# Allegro board PROC114E3_BRD.brd
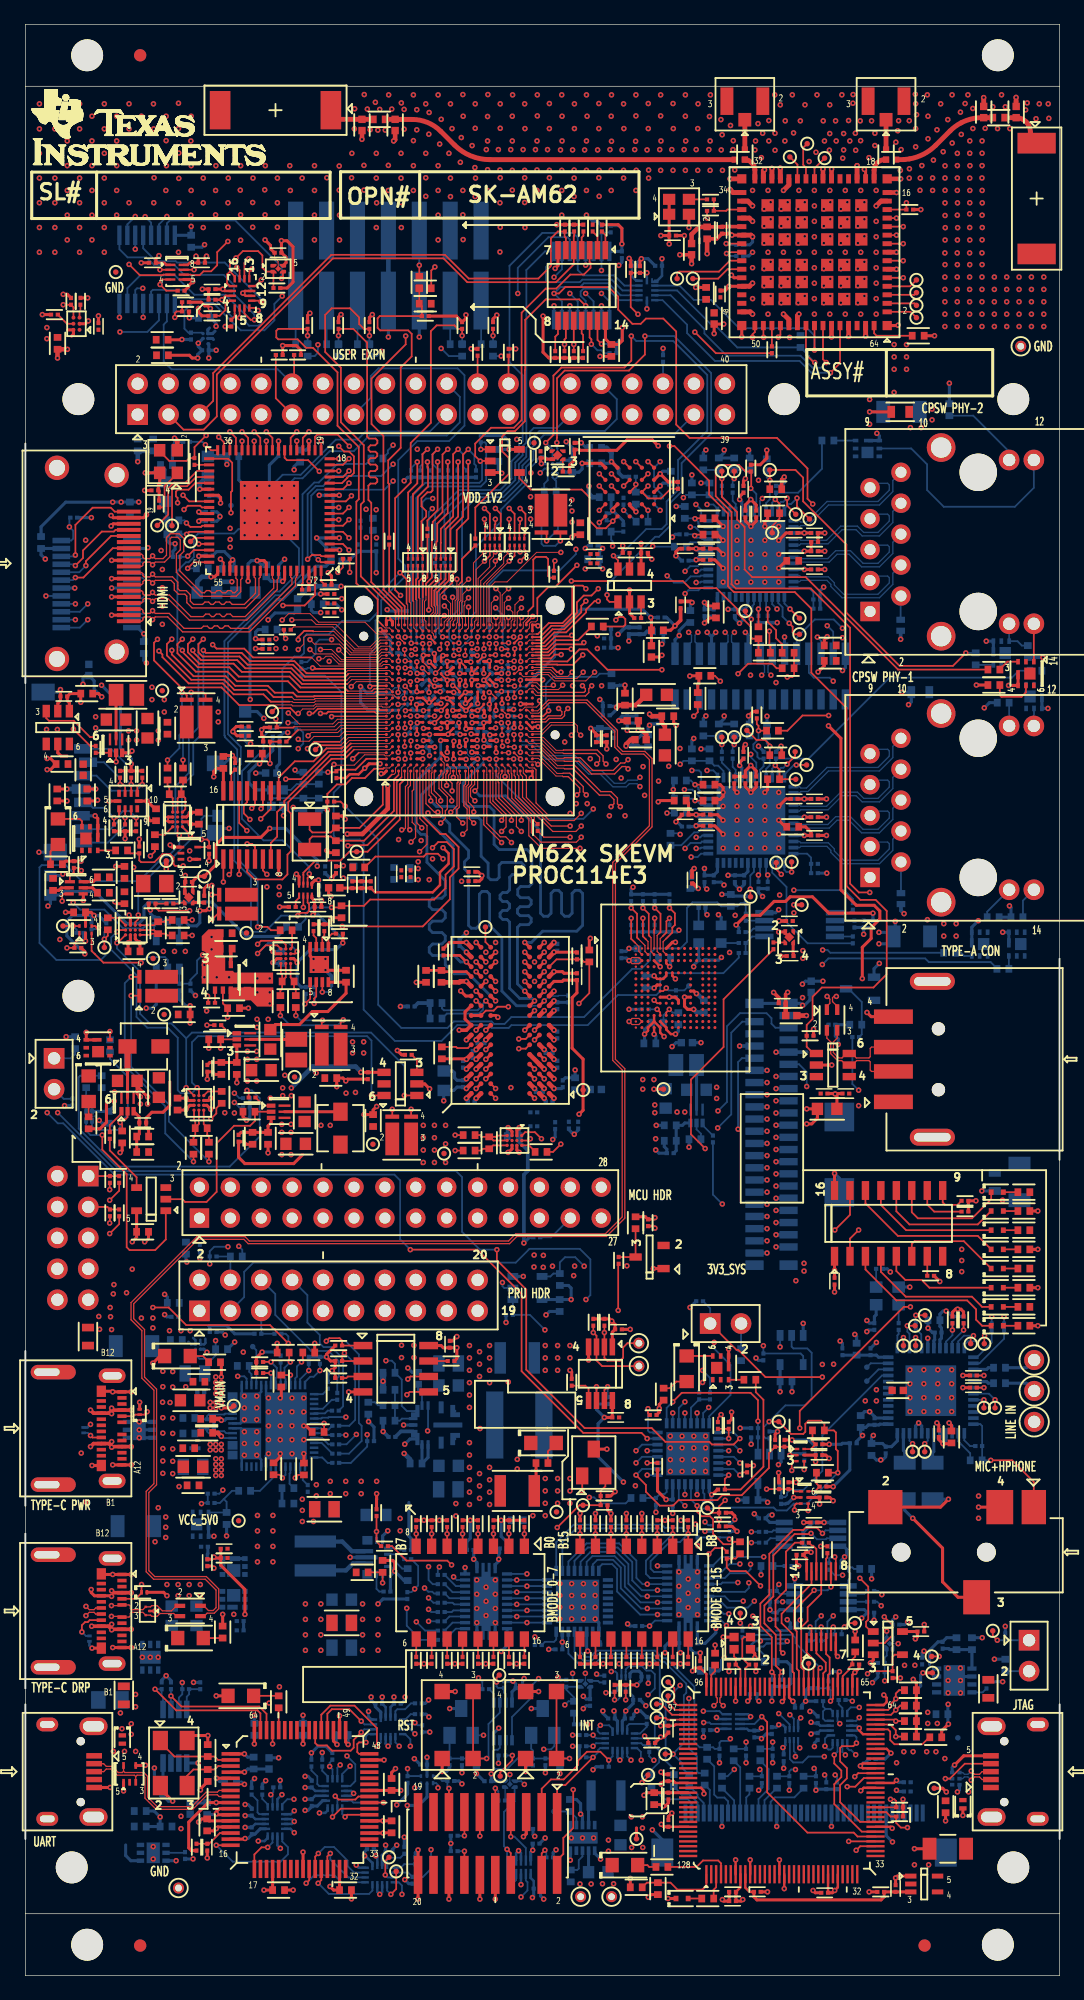
[diagram p0: board, top side]
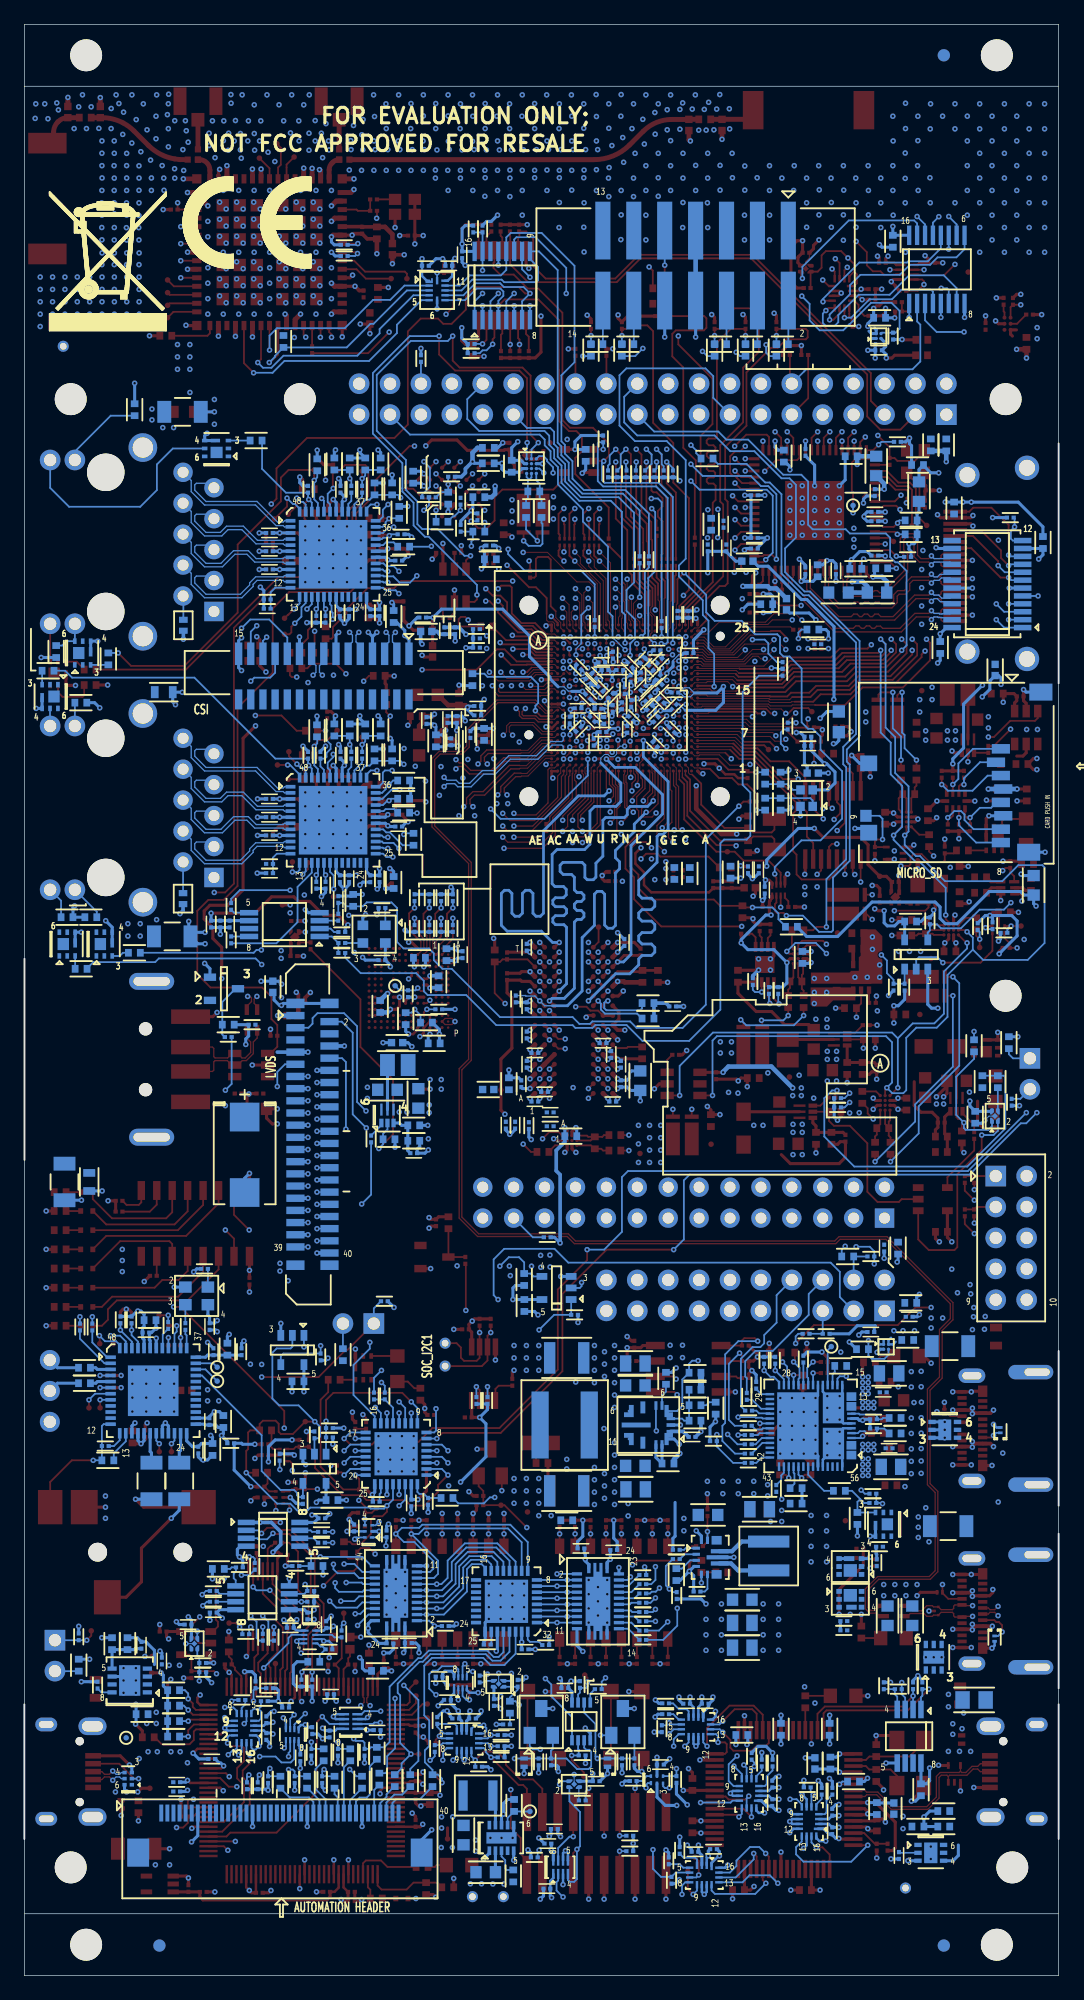
[diagram p1: board, bottom side, seen from below]

Outline 85 x 160.26 mm; copper layers: TOP, L02_GND1, L03_SIG1, L04_GND2, L05_PWR1, L06_PWR2, L07_GND3, L08_SIG2, L09_GND4, BOTTOM. Coordinates in mm from the lower left corner of the outline.
Outline path: 0,155.18 0,160.26 85,160.26 85,155.18 ; 0,155.18 0,5.08 ; 0,155.18 85,155.18 ; 0,5.08 0,0 85,0 85,5.08 ; 0,5.08 85,5.08 ; 85,5.08 85,155.18

## Design rules (mm)
net group CPSW_ETH1_D0: nets CPSW_ETH1_D0N CPSW_ETH1_D0P
net group CPSW_ETH1_D1: nets CPSW_ETH1_D1M CPSW_ETH1_D1P
net group CPSW_ETH1_D2: nets CPSW_ETH1_D2M CPSW_ETH1_D2P
net group CPSW_ETH1_D3: nets CPSW_ETH1_D3M CPSW_ETH1_D3P
net group CPSW_ETH2_D0: nets CPSW_ETH2_D0N CPSW_ETH2_D0P
net group CPSW_ETH2_D1: nets CPSW_ETH2_D1M CPSW_ETH2_D1P
net group CPSW_ETH2_D2: nets CPSW_ETH2_D2M CPSW_ETH2_D2P
net group CPSW_ETH2_D3: nets CPSW_ETH2_D3M CPSW_ETH2_D3P
net group CPSW_RGMII1_RXC: nets CPSW_RGMII1_RXC N17167245
net group CPSW_RGMII1_TXC: nets CPSW_RGMII1_TXC N16944070
net group CPSW_RGMII2_RXC: nets CPSW_RGMII2_RXC N17167691
net group CPSW_RGMII2_TXC: nets CPSW_RGMII2_TXC N16944341
net group FT4232_USB: nets FT4232_USB_DM FT4232_USB_DP
net group HDMI_PCLK: nets HDMI_PCLK SOC_VOUT0_PCLK
net group MCASP1_AFSX: nets MCASP1_AFSX N19066711
net group MCASP1_AXR0: nets MCASP1_AXR0 N19066744
net group MCASP1_AXR2: nets MCASP1_AXR2 N20055845
net group MCASP1_AXR2_AUD: nets MCASP1_AXR2_AUD N16929474
net group MMC0_CLK: nets MMC0_CLK SOC_MMC0_CLK
net group MMC1_CLK_R: nets MMC1_CLK MMC1_CLK_R
net group MMC2_CLK: nets MMC2_CLK SOC_MMC2_CLK
net group OSPI0_CSN0: nets OSPI0_CSN0 OSPI_CS
net group OSPI_CLK: nets N16960546 OSPI_CLK
net group SOC_OSPI_DQ0: nets OSPI_DQ0 SOC_OSPI_DQ0
net group SOC_OSPI_DQ1: nets OSPI_DQ1 SOC_OSPI_DQ1
net group SOC_OSPI_DQ2: nets OSPI_DQ2 SOC_OSPI_DQ2
net group SOC_OSPI_DQ3: nets OSPI_DQ3 SOC_OSPI_DQ3
net group SOC_OSPI_DQ4: nets OSPI_DQ4 SOC_OSPI_DQ4
net group SOC_OSPI_DQ5: nets OSPI_DQ5 SOC_OSPI_DQ5
net group SOC_OSPI_DQ6: nets OSPI_DQ6 SOC_OSPI_DQ6
net group SOC_OSPI_DQ7: nets OSPI_DQ7 SOC_OSPI_DQ7
net group SOC_USB0_DM: nets SOC_USB0_DM USBC_CONN2_DM
net group SOC_USB0_DP: nets SOC_USB0_DP USBC_CONN2_DP
net group SOC_USB1_DM: nets SOC_USB1_DM USB0_TYPEACONN1_DM
net group SOC_USB1_DP: nets SOC_USB1_DP USB0_TYPEACONN1_DP
net group XDS_USB: nets XDS_USB_DM XDS_USB_DP
net group DDR_ADDR: nets DDR_ALERTN
net group DDR_ADDR-1: nets DDR_TEN
net group HDMI_DIFF: nets HDMI_CLK+ HDMI_CLK- HDMI_TX0+ HDMI_TX0- HDMI_TX1+ HDMI_TX1- HDMI_TX2+ HDMI_TX2-
net group MCASP1: nets MCASP1_ACLKX
net group OSPI0_LBCLK: nets N16956470 OSPI0_LBCLK OSPI_DQS OSPI_DQS_SOC
net group PWR: nets VDDA_1V8_CSIRX VDDA_1V8_MCU VDDA_1V8_OLDI VDDA_1V8_USB VDDA_PLL0 VDDA_PLL1 VDDA_PLL2

## Placement (name value [footprint] x y rotation side)
A1  W3006  [ANT2_W3006_390X130_SMD]  20.56 153.21 180 top
A2  W3006  [ANT2_W3006_390X130_SMD]  83.11 145.95 270 top
ACC*  -  [unnamed#3]  35.67 104.69 90 top
C1  2.4pF  [CAP0402_0-75]  79.99 152.59 180 top
C2  1pF  [CAP0402_0-75]  29.08 152.45 0 top
C3  0.1uF  [CAP0201_0-5]  57.24 143.34 270 top
C4  2.2uF  [CAP0402_0-75]  56.03 143.13 270 top
C5  0.1uF  [CAP0201_0-5]  53.19 142.91 0 top
C6  0.1uF  [CAP0201_0-5]  10.44 140.67 0 top
C7  0.1uF  [CAP0201_0-5]  14.48 140.67 180 top
C8  0.1uF  [CAP0201_0-5]  15.34 138.51 0 top
C9  10uF  [CAP0402_0-75]  55.94 138.16 90 top
C10  0.1uF  [CAP0201_0-5]  57.12 138.12 90 top
C11  0.1uF  [CAP0201_0-5]  15.34 137.65 0 top
C12  1uF  [CAP0201_0-5]  6.01 135.46 90 top
C13  2.2uF  [CAP0402_0-75]  11.24 134.35 0 top
C14  2.2uF  [CAP0402_0-75]  2.64 134.06 270 top
C15  0.1uF  [CAP0402_0-75]  11.27 133.08 180 top
C16  1uF  [CAP0201_0-5]  45.13 125.61 90 top
C17  1uF  [CAP0201_0-5]  42.34 124.92 270 top
C18  0.1uF  [CAP0402_0-75]  43.13 121.9 0 bottom
C19  1uF  [CAP0201_0-5]  59.02 122.07 90 top
C20  0.1uF  [CAP0201_0-5]  10.64 121.98 0 top
C21  1uF  [CAP0201_0-5]  59.17 120.04 270 top
C22  0.1uF  [CAP0201_0-5]  60.06 120.04 270 top
C23  0.1uF  [CAP0402_0-75]  45.61 118.83 90 top
C24  0.01uF  [CAP0201_0-5]  63.18 118.49 180 top
C25  0.1uF  [CAP0201_0-5]  64.85 118.49 0 top
C26  0.01uF  [CAP0201_0-5]  64.86 117.74 0 top
C27  0.1uF  [CAP0201_0-5]  54.22 117.19 180 top
C28  1uF  [CAP0201_0-5]  55.99 117.19 0 top
C29  0.1uF  [CAP0201_0-5]  64.85 116.99 0 top
C30  0.01uF  [CAP0201_0-5]  50.88 116.85 180 top
C31  0.1uF  [CAP0201_0-5]  46.73 116.75 0 top
C32  0.1uF  [CAP0201_0-5]  55.99 116.28 0 top
C33  10uF  [CAP0402_0-75]  63.06 116.2 180 top
C34  0.1uF  [CAP0201_0-5]  46.73 115.99 0 top
C35  1uF  [CAP0201_0-5]  64.85 115.49 0 top
C36  0.1uF  [CAP0201_0-5]  25.11 113.47 180 top
C37  1uF  [CAP0201_0-5]  25.11 112.71 0 top
C38  0.01uF  [CAP0201_0-5]  53.85 112.58 270 top
C39  10uF  [CAP0402_0-75]  56.76 112 270 top
C40  0.1uF  [CAP0201_0-5]  25.11 111.95 180 top
C41  4.7uF  [CAP0402_0-75]  51.94 110.5 0 top
C42  0.1uF  [CAP0201_0-5]  19.77 109.73 180 top
C43  10uF  [CAP0402_0-75]  66.15 109.25 180 top
C44  0.1uF  [CAP0201_0-5]  19.77 108.97 180 top
C45  0.1uF  [CAP0402_0-75]  66.15 107.98 180 top
C46  0.1uF  [CAP0402_0-75]  5.04 105.29 0 top
C47  1uF  [CAP0201_0-5]  3.16 105.06 180 top
C48  4.7uF  [CAP0402_0-75]  49.28 104.84 90 top
C49  4.7uF  [CAP0402_0-75]  52.79 103.44 0 top
C50  4.7uF  [CAP0603_1]  7.46 103.16 0 top
C51  0.01uF  [CAP0201_0-5]  18.06 102.59 180 top
C52  22uF  [CAP0603_1]  10.04 102.45 270 top
C53  0.1uF  [CAP0402_0-75]  11.68 102.45 90 top
C54  0.1uF  [CAP0201_0-5]  18.06 101.83 180 top
C55  0.1uF  [CAP0201_0-5]  46.89 101.59 90 top
C56  0.1uF  [CAP0201_0-5]  47.78 101.59 90 top
C57  4.7uF  [CAP0402_0-75]  18.98 100.36 0 top
C58  1uF  [CAP0201_0-5]  59.02 100.23 90 top
C59  0.1uF  [CAP0402_0-75]  16.27 99.64 270 top
C60  4.7uF  [CAP0402_0-75]  3.02 99.51 180 top
C61  0.01uF  [CAP0201_0-5]  58.26 98.2 270 top
C62  1uF  [CAP0201_0-5]  59.17 98.2 270 top
C63  0.1uF  [CAP0201_0-5]  60.06 98.2 270 top
C64  0.1uF  [CAP0402_0-75]  12.32 97.03 0 top
C65  2.2uF  [CAP0402_0-75]  2.62 96.97 90 top
C66  0.1uF  [CAP0402_0-75]  5.08 96.97 90 top
C67  0.01uF  [CAP0201_0-5]  63.18 96.64 180 top
C68  0.1uF  [CAP0201_0-5]  64.85 96.64 0 top
C69  10uF  [CAP0402_0-75]  53.81 96.5 180 top
C70  0.1uF  [CAP0201_0-5]  54.22 95.35 180 top
C71  1uF  [CAP0201_0-5]  55.99 95.35 0 top
C72  0.1uF  [CAP0402_0-75]  10.74 95.35 90 top
C73  0.1uF  [CAP0201_0-5]  64.85 95.14 0 top
C74  0.1uF  [CAP0402_0-75]  14.26 95.06 90 top
C75  9pF  [CAP0402_0-75]  25.52 94.75 90 top
C76  0.1uF  [CAP0201_0-5]  55.99 94.44 0 top
C77  10uF  [CAP0402_0-75]  63.06 94.35 180 top
C78  1uF  [CAP0201_0-5]  64.85 93.64 0 top
C79  9pF  [CAP0402_0-75]  25.52 92.72 270 top
C80  0.1uF  [CAP0201_0-5]  25.53 90.82 270 top
C81  1uF  [CAP0201_0-5]  36.7 90.66 0 top
C82  0.1uF  [CAP0201_0-5]  30.89 90.5 270 top
C83  0.1uF  [CAP0201_0-5]  31.65 90.5 270 top
C84  0.01uF  [CAP0201_0-5]  54.79 89.98 270 top
C85  0.1uF  [CAP0201_0-5]  36.7 89.89 0 top
C86  1uF  [CAP0201_0-5]  13.42 89.82 0 top
C87  0.1uF  [CAP0402_0-75]  2.27 89.62 90 top
C88  1uF  [CAP0201_0-5]  26.86 89.6 90 top
C89  0.1uF  [CAP0201_0-5]  27.63 89.6 90 top
C90  0.01uF  [CAP0201_0-5]  28.39 89.6 90 top
C91  2.2uF  [CAP0402_0-75]  8.14 88.53 270 top
C92  1uF  [CAP0201_0-5]  14.7 88.41 90 top
C93  0.1uF  [CAP0201_0-5]  24.05 87.77 180 top
C94  0.1uF  [CAP0402_0-75]  4.45 87.33 180 top
C95  1uF  [CAP0201_0-5]  62.79 86.62 180 top
C96  0.1uF  [CAP0402_0-75]  10.91 86.07 270 top
C97  0.1uF  [CAP0402_0-75]  16.5 85.62 0 top
C98  2.2uF  [CAP0402_0-75]  16.5 84.35 180 top
C99  0.1uF  [CAP0402_0-75]  8.93 84.12 0 top
C100  1uF  [CAP0201_0-5]  62.85 83.74 180 top
C101  0.1uF  [CAP0402_0-75]  26.35 82.08 90 top
C102  0.1uF  [CAP0201_0-5]  45.33 82.04 270 top
C103  0.1uF  [CAP0402_0-75]  21.59 81.65 180 top
C104  2.2uF  [CAP0402_0-75]  18.25 81.42 90 top
C105  120pF  [CAP0201_0-5]  9.65 70.06 180 top
C106  0.1uF  [CAP0402_0-75]  13.05 78.94 180 top
C107  22uF  [CAP0603_1]  10.97 72.94 270 top
C108  4.7uF  [CAP0603_1]  20.13 76.9 270 top
C110  4.7uF  [CAP0603_1]  8.38 73.49 0 top
C111  120pF  [CAP0201_0-5]  14.95 74.51 90 top
C112  22uF  [CAP0603_1]  19.39 74.36 180 top
C113  0.01uF  [CAP0201_0-5]  28.15 73.91 90 top
C114  0.1uF  [CAP0402_0-75]  25.1 73.72 180 top
C115  0.1uF  [CAP0201_0-5]  65.64 72.44 0 top
C116  0.1uF  [CAP0402_0-75]  12.51 71.58 270 top
C117  4.7uF  [CAP0603_1]  22.95 70.95 270 top
C118  0.1uF  [CAP0402_0-75]  28.58 70.23 270 top
C119  0.1uF  [CAP0402_0-75]  14.45 69.6 180 top
C120  120pF  [CAP0201_0-5]  17.52 68.77 90 top
C121  0.1uF  [CAP0402_0-75]  38.12 68.4 90 top
C122  22uF  [CAP0603_1]  22.21 68.32 180 top
C129  0.1uF  [CAP0201_0-5]  62.2 79.87 0 top
C134  0.1uF  [CAP0201_0-5]  34.87 51.85 90 top
C135  220pF  [CAP0402_0-75]  23.29 51.18 0 top
C136  220pF  [CAP0402_0-75]  21.19 51.18 180 top
C137  0.1uF  [CAP0201_0-5]  77.91 49.29 180 top
C138  4.7uF  [CAP0402_0-75]  21.03 48.83 270 top
C139  0.1uF  [CAP0402_0-75]  14.26 48.77 180 top
C140  0.1uF  [CAP0201_0-5]  77.91 48.29 180 top
C141  10uF  [CAP0603_1]  13.54 47.25 180 top
C142  10uF  [CAP0402_0-75]  14.9 45.73 0 top
C143  4.7uF  [CAP0402_0-75]  24.06 44.65 180 top
C144  10uF  [CAP0402_0-75]  14.9 44.58 0 top
C145  0.1uF  [CAP0201_0-5]  75.07 44.5 90 top
C146  10uF  [CAP0402_0-75]  76.11 44.25 90 top
C147  0.1uF  [CAP0402_0-75]  13.43 43.32 180 top
C148  0.1uF  [CAP0201_0-5]  65.22 42.75 0 top
C149  10uF  [CAP0805_1-5]  24.57 38.31 180 bottom
C150  10uF  [CAP0603_1]  13.78 41.79 180 top
C151  220pF  [CAP0402_0-75]  20.4 41.63 90 top
C152  220pF  [CAP0402_0-75]  22.89 41.62 90 top
C153  0.1uF  [CAP0402_0-75]  13.78 40.27 180 top
C154  47uF  [CAP1210_2-75]  40.43 39.81 180 top
C155  10uF  [CAP0603_1]  26 30.88 180 bottom
C156  0.1uF  [CAP0201_0-5]  47.56 38.64 180 top
C157  0.1uF  [CAP0201_0-5]  65.55 39.27 0 top
C158  22uF  [CAP0805_1-5]  26 28.97 180 top
C159  0.1uF  [CAP0201_0-5]  48.74 53.08 0 top
C160  22uF  [CAP0805_1-5]  26 26.94 180 bottom
C161  0.1uF  [CAP0201_0-5]  16.33 35.06 180 top
C162  0.1uF  [CAP0201_0-5]  14.95 33.92 90 top
C164  0.1uF  [CAP0402_0-75]  31.42 32.94 270 bottom
C166  0.1uF  [CAP0201_0-5]  48.52 45.85 0 top
C167  0.1uF  [CAP0201_0-5]  73.59 28.26 0 top
C169  0.1uF  [CAP0201_0-5]  68.24 25.56 180 top
C170  0.1uF  [CAP0201_0-5]  55.46 25.56 270 top
C171  12pF  [CAP0201_0-5]  58.1 25.55 0 top
C172  12pF  [CAP0201_0-5]  59.75 25.55 180 top
C173  0.1uF  [CAP0201_0-5]  52.85 20.24 90 top
C174  18pF  [CAP0402_0-75]  14.99 18.49 90 top
C175  18pF  [CAP0402_0-75]  14.99 16.44 270 top
C176  0.01uF  [CAP0201_0-5]  52.85 16.26 90 top
C177  0.1uF  [CAP0402_0-75]  30.1 15.7 270 top
C178  1uF  [CAP0201_0-5]  52.85 14.75 270 top
C179  2.2uF  [CAP0402_0-75]  51.68 14.54 270 top
C180  4.7uF  [CAP0402_0-75]  75.62 13.87 270 top
C181  0.01uF  [CAP0201_0-5]  52.85 12.51 90 top
C182  0.1uF  [CAP0402_0-75]  14.94 12.38 90 top
C183  0.1uF  [CAP0402_0-75]  30.1 12.22 90 top
C184  0.1uF  [CAP0201_0-5]  14.95 10.55 90 top
C185  1000pF  [CAP1206_1-75]  75.81 10.42 0 top
C186  0.01uF  [CAP0201_0-5]  71.51 7.16 90 top
C187  0.1uF  [CAP0402_0-75]  20.81 7.03 180 top
C188  0.1uF  [CAP0402_0-75]  26.31 7.03 180 top
C189  0.01uF  [CAP0201_0-5]  58.12 6.88 180 top
C190  0.1uF  [CAP0201_0-5]  60.15 6.88 180 top
C191  0.01uF  [CAP0201_0-5]  65.69 6.81 180 top
C192  1uF  [CAP0201_0-5]  58.12 6.12 180 top
C193  2.2uF  [CAP0402_0-75]  14.72 136.15 180 bottom
C194  1uF  [CAP0201_0-5]  14.8 133.49 180 bottom
C195  1000pF  [CAP1206_1-75]  72 128.43 180 bottom
C196  0.1uF  [CAP0402_0-75]  10.5 125.71 90 bottom
C197  2.2uF  [CAP0402_0-75]  9.23 125.71 270 bottom
C198  4.7uF  [CAP0402_0-75]  46.86 125.48 0 bottom
C199  10uF  [CAP0402_0-75]  22.58 124.8 270 bottom
C200  0.1uF  [CAP0201_0-5]  20.8 125.1 270 bottom
C201  10uF  [CAP0402_0-75]  17.05 124.79 0 bottom
C202  0.1uF  [CAP0402_0-75]  38.87 124.86 270 bottom
C203  0.1uF  [CAP0402_0-75]  46.87 124.21 180 bottom
C204  10uF  [CAP0402_0-75]  11.6 124.06 0 bottom
C205  0.1uF  [CAP0402_0-75]  44.95 123.96 270 bottom
C206  0.1uF  [CAP0402_0-75]  53.05 123.06 270 bottom
C207  0.1uF  [CAP0201_0-5]  15.1 121.8 270 bottom
C208  0.1uF  [CAP0201_0-5]  59.02 122.07 90 bottom
C209  0.1uF  [CAP0201_0-5]  25 121.58 180 bottom
C210  0.1uF  [CAP0402_0-75]  47.65 121.42 180 bottom
C211  10uF  [CAP0402_0-75]  8.59 120.53 90 bottom
C212  0.1uF  [CAP0201_0-5]  15.1 120.21 0 bottom
C213  0.1uF  [CAP0201_0-5]  15.1 119.45 0 bottom
C214  4.7uF  [CAP0402_0-75]  28.56 119.2 270 bottom
C215  1uF  [CAP0201_0-5]  27.54 119.2 90 bottom
C216  0.1uF  [CAP0201_0-5]  64.85 118.49 0 bottom
C217  0.1uF  [CAP0201_0-5]  25 118.08 180 bottom
C218  0.1uF  [CAP0201_0-5]  46.75 117.45 0 bottom
C219  10uF  [CAP0402_0-75]  1.29 117.7 90 bottom
C220  0.01uF  [CAP0201_0-5]  28.84 117.26 90 bottom
C221  0.1uF  [CAP0201_0-5]  37.66 105.67 45 bottom
C222  1uF  [CAP0201_0-5]  27.31 117.26 90 bottom
C223  0.1uF  [CAP0201_0-5]  25 117.21 180 bottom
C224  1uF  [CAP0201_0-5]  64.85 116.99 0 bottom
C225  0.1uF  [CAP0201_0-5]  15.1 116.63 0 bottom
C226  4.7uF  [CAP0402_0-75]  46.7 116.33 0 bottom
C227  1uF  [CAP0201_0-5]  54.24 116.22 180 bottom
C228  1uF  [CAP0201_0-5]  64.85 115.49 0 bottom
C229  0.1uF  [CAP0201_0-5]  20.82 115.38 90 bottom
C230  10uF  [CAP0402_0-75]  19.8 115.38 90 bottom
C231  0.1uF  [CAP0201_0-5]  18.3 115.38 90 bottom
C232  22uF  [CAP0603_1]  14.92 113.59 180 bottom
C233  4.7uF  [CAP0402_0-75]  23.99 112.63 180 bottom
C234  22pF  [CAP0201_0-5]  65.04 112.26 180 bottom
C235  0.1uF  [CAP0201_0-5]  59.07 111.93 270 bottom
C236  1uF  [CAP0201_0-5]  58.31 111.93 270 bottom
C237  1uF  [CAP0201_0-5]  56.57 111.93 270 bottom
C238  0.1uF  [CAP0201_0-5]  55.81 111.93 270 bottom
C239  1uF  [CAP0201_0-5]  33.01 108.85 180 bottom
C240  0.1uF  [CAP0201_0-5]  30.44 111.8 270 bottom
C241  0.1uF  [CAP0201_0-5]  31.33 111.8 270 bottom
C242  10uF  [CAP0402_0-75]  54.65 111.62 270 bottom
C243  0.1uF  [CAP0201_0-5]  52.26 111.54 0 bottom
C244  1uF  [CAP0201_0-5]  47.84 110.59 0 bottom
C245  0.1uF  [CAP0201_0-5]  50.48 110.46 90 bottom
C246  1uF  [CAP0201_0-5]  49.59 110.46 90 bottom
C247  0.1uF  [CAP0201_0-5]  47.84 109.82 0 bottom
C248  10uF  [CAP0402_0-75]  9.73 109.08 90 bottom
C249  1uF  [CAP0201_0-5]  19.79 109.35 0 bottom
C250  0.1uF  [CAP0201_0-5]  47.84 109.06 0 bottom
C251  1uF  [CAP0201_0-5]  36.63 108.46 90 bottom
C252  0.1uF  [CAP0201_0-5]  34.16 107.99 135 bottom
C253  0.1uF  [CAP0201_0-5]  32.78 107.97 135 bottom
C254  0.1uF  [CAP0201_0-5]  37.54 107.85 0 bottom
C255  0.1uF  [CAP0201_0-5]  35.22 107.64 225 bottom
C256  1uF  [CAP0201_0-5]  39.43 107.46 45 bottom
C257  1uF  [CAP0201_0-5]  33.49 107.42 45 bottom
C258  1uF  [CAP0201_0-5]  32.93 106.61 315 bottom
C259  0.1uF  [CAP0201_0-5]  37.28 107.23 180 bottom
C260  0.1uF  [CAP0201_0-5]  36.06 107.23 0 bottom
C261  0.1uF  [CAP0201_0-5]  34.33 106.75 90 bottom
C262  0.1uF  [CAP0201_0-5]  38.18 106.73 45 bottom
C263  0.1uF  [CAP0201_0-5]  30.29 108.62 180 bottom
C264  0.1uF  [CAP0201_0-5]  35.18 106.53 90 bottom
C265  0.1uF  [CAP0201_0-5]  38.65 106.32 225 bottom
C266  0.1uF  [CAP0201_0-5]  31.54 105.38 180 bottom
C267  0.1uF  [CAP0201_0-5]  34.14 105.78 135 bottom
C268  0.1uF  [CAP0201_0-5]  36.81 105.12 315 bottom
C269  1uF  [CAP0201_0-5]  32.78 105.83 135 bottom
C270  0.01uF  [CAP0201_0-5]  38.68 105.03 225 bottom
C271  0.1uF  [CAP0201_0-5]  33.75 104.87 135 bottom
C272  0.1uF  [CAP0201_0-5]  32.63 104.72 45 bottom
C273  0.1uF  [CAP0201_0-5]  35.13 104.48 90 bottom
C274  0.1uF  [CAP0201_0-5]  35.88 104.29 90 bottom
C275  0.1uF  [CAP0201_0-5]  47.74 104.27 180 bottom
C276  1uF  [CAP0201_0-5]  31.61 104.21 135 bottom
C277  0.1uF  [CAP0201_0-5]  33.62 104.16 135 bottom
C278  0.1uF  [CAP0201_0-5]  39.5 104.08 0 bottom
C279  0.1uF  [CAP0201_0-5]  36.64 104.06 90 bottom
C280  0.1uF  [CAP0201_0-5]  37.86 104.05 0 bottom
C281  0.01uF  [CAP0201_0-5]  47.74 103.51 180 bottom
C282  0.1uF  [CAP0201_0-5]  35.13 103.23 45 bottom
C283  0.1uF  [CAP0201_0-5]  38.33 103.19 225 bottom
C284  0.1uF  [CAP0201_0-5]  50.22 103.16 270 bottom
C285  1uF  [CAP0201_0-5]  49.46 103.16 270 bottom
C286  0.1uF  [CAP0201_0-5]  33.08 103.16 135 bottom
C287  0.01uF  [CAP0201_0-5]  40.18 103.12 270 bottom
C288  0.01uF  [CAP0201_0-5]  37.34 103.09 270 bottom
C289  0.01uF  [CAP0201_0-5]  51.96 103.08 270 bottom
C290  0.01uF  [CAP0201_0-5]  39.46 102.37 315 bottom
C291  0.1uF  [CAP0201_0-5]  35.45 102.36 270 bottom
C292  0.1uF  [CAP0201_0-5]  37.45 102.14 0 bottom
C293  4.7uF  [CAP0402_0-75]  47.22 101.94 90 bottom
C294  1uF  [CAP0201_0-5]  31.76 102.3 225 bottom
C295  0.1uF  [CAP0201_0-5]  48.34 101.93 90 bottom
C296  0.01uF  [CAP0201_0-5]  20.61 101.76 180 bottom
C297  4.7uF  [CAP0402_0-75]  51.17 101.41 90 bottom
C298  0.1uF  [CAP0201_0-5]  49.91 101.33 90 bottom
C299  1uF  [CAP0201_0-5]  20.61 100.99 180 bottom
C300  0.1uF  [CAP0201_0-5]  35.67 105.55 90 bottom
C301  0.1uF  [CAP0201_0-5]  59.02 100.23 90 bottom
C302  1uF  [CAP0201_0-5]  38.21 101.31 90 bottom
C303  18pF  [CAP0402_0-75]  22.85 98.35 270 bottom
C304  0.1uF  [CAP0201_0-5]  64.85 96.64 0 bottom
C305  18pF  [CAP0402_0-75]  22.85 96.21 90 bottom
C306  1uF  [CAP0201_0-5]  64.85 95.14 0 bottom
C307  1uF  [CAP0201_0-5]  54.24 94.37 180 bottom
C308  1uF  [CAP0201_0-5]  64.85 93.64 0 bottom
C309  0.1uF  [CAP0201_0-5]  25.53 90.82 270 bottom
C310  0.1uF  [CAP0201_0-5]  24.64 90.82 270 bottom
C311  10uF  [CAP0402_0-75]  26.96 90.63 270 bottom
C312  22pF  [CAP0201_0-5]  64.85 90.55 180 bottom
C313  10uF  [CAP0402_0-75]  31.58 90.52 270 bottom
C314  4.7uF  [CAP0402_0-75]  30.31 90.52 270 bottom
C315  0.1uF  [CAP0201_0-5]  59.07 90.09 270 bottom
C316  1uF  [CAP0201_0-5]  58.31 90.09 270 bottom
C317  1uF  [CAP0201_0-5]  56.57 90.09 270 bottom
C318  0.1uF  [CAP0201_0-5]  55.81 90.09 270 bottom
C319  10uF  [CAP0402_0-75]  54.65 89.78 270 bottom
C320  10uF  [CAP0603_1]  2.06 89.55 90 bottom
C321  0.1uF  [CAP0201_0-5]  24.15 89.15 270 bottom
C322  10pF  [CAP0201_0-5]  59.2 88.38 90 bottom
C323  0.1uF  [CAP0402_0-75]  12.17 86.57 180 bottom
C324  1uF  [CAP0201_0-5]  69.65 86.37 90 bottom
C325  0.1uF  [CAP0201_0-5]  68.89 86.37 90 bottom
C326  0.1uF  [CAP0201_0-5]  68.13 86.37 90 bottom
C327  1000pF  [CAP1206_1-75]  72.85 85.35 180 bottom
C328  0.1uF  [CAP0201_0-5]  35.68 84.86 270 bottom
C329  0.01uF  [CAP0201_0-5]  43.72 84.46 90 bottom
C330  1uF  [CAP0201_0-5]  48.98 83.85 90 bottom
C331  0.1uF  [CAP0402_0-75]  50.31 83.85 90 bottom
C332  0.1uF  [CAP0402_0-75]  21.05 83.63 270 bottom
C333  0.1uF  [CAP0402_0-75]  52.53 83.59 180 bottom
C334  0.01uF  [CAP0201_0-5]  55.61 83.4 180 bottom
C335  0.1uF  [CAP0402_0-75]  50.95 81.63 270 bottom
C336  0.01uF  [CAP0201_0-5]  43.72 79.66 90 bottom
C337  0.01uF  [CAP0201_0-5]  31.72 79.6 180 bottom
C338  2.2uF  [CAP0402_0-75]  55.76 79.6 90 bottom
C339  0.01uF  [CAP0201_0-5]  43.72 77.26 90 bottom
C340  0.01uF  [CAP0201_0-5]  37.44 76.58 180 bottom
C341  2.2uF  [CAP0402_0-75]  51.32 76.57 0 bottom
C343  0.01uF  [CAP0201_0-5]  43.04 75.78 0 bottom
C344  0.01uF  [CAP0201_0-5]  36.77 75.66 270 bottom
C346  0.01uF  [CAP0201_0-5]  43.72 74.86 90 bottom
C347  0.01uF  [CAP0201_0-5]  35.97 74.86 90 bottom
C349  22uF  [CAP0603_1]  34.38 73.5 90 bottom
C350  0.01uF  [CAP0201_0-5]  35.97 73.26 90 bottom
C351  2.2uF  [CAP0402_0-75]  45.18 73.25 90 bottom
C352  0.1uF  [CAP0201_0-5]  44.16 73.25 270 bottom
C353  4.7uF  [CAP0603_1]  55.16 72.76 180 bottom
C354  0.01uF  [CAP0201_0-5]  42.24 72.58 0 bottom
C355  0.1uF  [CAP0201_0-5]  67.43 72.44 180 top
C356  10uF  [CAP0603_1]  65.89 71.19 0 top
C357  22uF  [CAP0603_1]  52.62 72.04 270 bottom
C358  0.01uF  [CAP0201_0-5]  43.04 71.78 180 bottom
C359  0.01uF  [CAP0201_0-5]  36.64 71.78 0 bottom
C361  0.1uF  [CAP0201_0-5]  41.78 70.9 180 bottom
C362  0.1uF  [CAP0201_0-5]  45.43 69.85 90 bottom
C363  0.1uF  [CAP0201_0-5]  44.67 69.85 90 bottom
C365  0.1uF  [CAP0402_0-75]  40.09 68.95 180 bottom
C367  120pF  [CAP0201_0-5]  53 67.55 0 bottom
C371  150uF_10V  [CAPT7343D_3-25]  66.89 67.42 270 bottom
C372  1000pF  [CAP1206_1-75]  81.7 65.19 270 bottom
C375  0.1uF  [CAP0201_0-5]  66.5 57.04 270 top
C376  1uF  [CAP0201_0-5]  14.34 59.75 270 bottom
C377  0.1uF  [CAP0402_0-75]  13.2 59.75 90 bottom
C379  2.2uF  [CAP0402_0-75]  12.15 55.26 180 bottom
C380  0.1uF  [CAP0402_0-75]  43.91 55.04 270 bottom
C381  0.1uF  [CAP0201_0-5]  12.28 54.11 0 bottom
C384  10uF  [CAP0402_0-75]  74.67 53.83 180 bottom
C385  0.1uF  [CAP0201_0-5]  50.12 140.43 180 bottom
C386  0.1uF  [CAP0201_0-5]  69.77 53.31 270 bottom
C387  1uF  [CAP0201_0-5]  15.43 52.86 0 bottom
C388  0.1uF  [CAP0201_0-5]  75.01 52.82 180 bottom
C391  2.2uF  [CAP0402_0-75]  12.4 52.21 180 bottom
C392  1000pF  [CAP1206_1-75]  8.93 51.7 0 bottom
C393  10uF  [CAP0402_0-75]  68.31 51.45 90 bottom
C394  0.1uF  [CAP0201_0-5]  69.46 51.24 90 bottom
C395  47uF  [CAP1210_2-75]  40.43 50.73 180 bottom
C396  1uF  [CAP0805_1-5]  34.79 50.28 0 bottom
C397  0.1uF  [CAP0402_0-75]  80.06 49.93 180 bottom
C398  1uF  [CAP0805_1-5]  13.93 49.46 180 bottom
C399  0.1uF  [CAP0402_0-75]  80.06 48.66 180 bottom
C400  10uF  [CAP0603_1]  34.79 48.47 0 bottom
C401  0.01uF  [CAP0201_0-5]  14.42 47.91 180 bottom
C402  36pF  [CAP0402_0-75]  29.88 46.85 0 bottom
C404  0.1uF  [CAP0201_0-5]  49.02 141.33 90 bottom
C405  0.1uF  [CAP0201_0-5]  69.79 45.51 90 bottom
C406  10uF  [CAP0402_0-75]  68.64 45.51 90 bottom
C407  1uF  [CAP0201_0-5]  30.13 44.24 180 bottom
C408  0.1uF  [CAP0402_0-75]  13.63 142.44 90 bottom
C409  0.01uF  [CAP0201_0-5]  13.93 43.31 180 bottom
C410  10uF  [CAP0402_0-75]  69.53 43.22 270 bottom
C411  0.1uF  [CAP0201_0-5]  70.7 43.16 270 bottom
C412  0.47uF  [CAP0402_0-75]  78.14 42.32 180 bottom
C413  0.1uF  [CAP0402_0-75]  32.1 42.06 180 bottom
C414  10uF  [CAP0603_1]  34.79 41.87 0 bottom
C415  1uF  [CAP0805_1-5]  13.78 41.79 180 bottom
C416  47uF  [CAP1206_2]  74.55 40.63 270 bottom
C417  47uF  [CAP1206_2]  72.27 40.63 270 bottom
C418  1uF  [CAP0805_1-5]  34.76 39.94 0 bottom
C419  47uF  [CAP1210_2-75]  40.43 39.81 180 bottom
C420  22uF  [CAP0805_1-5]  26 28.97 180 bottom
C421  0.1uF  [CAP0402_0-75]  59.72 39.06 180 bottom
C422  0.01uF  [CAP0201_0-5]  53.2 38.82 90 bottom
C423  4.7uF  [CAP0402_0-75]  21.58 38.77 0 bottom
C424  10uF  [CAP0603_1]  28.82 37.84 0 bottom
C425  10uF  [CAP0805_1-5]  24.57 38.31 180 top
C426  0.1uF  [CAP0402_0-75]  40.43 37.4 180 bottom
C427  1000pF  [CAP1206_1-75]  9.08 36.92 0 bottom
C429  0.1uF  [CAP0201_0-5]  57.89 36.77 270 bottom
C430  0.1uF  [CAP0201_0-5]  39.26 35.09 180 bottom
C431  0.1uF  [CAP0201_0-5]  36.56 34.96 180 bottom
C432  10uF  [CAP0603_1]  14.06 29.56 90 bottom
C433  10uF  [CAP0603_1]  12.03 29.56 90 bottom
C435  0.1uF  [CAP0201_0-5]  17.65 29.12 0 bottom
C437  0.1uF  [CAP0201_0-5]  71.55 28.83 180 bottom
C439  0.1uF  [CAP0201_0-5]  53.44 27.32 0 bottom
C440  0.1uF  [CAP0201_0-5]  54.95 27.29 180 bottom
C441  15pF  [CAP0201_0-5]  75.38 27.14 270 bottom
C442  0.01uF  [CAP0201_0-5]  43.85 26.8 0 bottom
C443  1uF  [CAP0201_0-5]  73.7 25.84 90 bottom
C445  0.1uF  [CAP0201_0-5]  50.91 24.56 180 bottom
C446  0.1uF  [CAP0201_0-5]  40.58 23.61 180 bottom
C449  0.1uF  [CAP0201_0-5]  59.83 23.12 180 bottom
C450  0.1uF  [CAP0201_0-5]  50.23 22.65 180 bottom
C451  0.01uF  [CAP0201_0-5]  46.41 22.44 90 bottom
C452  0.1uF  [CAP0201_0-5]  30.57 22.34 180 bottom
C453  0.1uF  [CAP0201_0-5]  29.05 22.34 0 bottom
C454  1uF  [CAP0201_0-5]  63.53 22.01 0 bottom
C455  2.2uF  [CAP0402_0-75]  75.32 21.47 0 bottom
C456  0.1uF  [CAP0201_0-5]  49.54 21.12 180 bottom
C457  0.1uF  [CAP0201_0-5]  48.17 21.12 0 bottom
C458  0.1uF  [CAP0201_0-5]  65.11 21.02 270 bottom
C459  8.2pF  [CAP0201_0-5]  45.37 20.64 0 bottom
C460  0.1uF  [CAP0402_0-75]  22.82 20.23 270 bottom
C461  0.1uF  [CAP0402_0-75]  18.82 20.23 270 bottom
C462  0.1uF  [CAP0201_0-5]  56.01 20.17 0 bottom
C463  0.1uF  [CAP0201_0-5]  61.34 20.13 90 bottom
C464  0.1uF  [CAP0201_0-5]  59.91 19.85 90 bottom
C465  4.7uF  [CAP0402_0-75]  26.04 19.76 180 bottom
C466  0.1uF  [CAP0201_0-5]  65.11 19.64 90 bottom
C467  0.1uF  [CAP0201_0-5]  62.32 17.89 90 bottom
C468  0.1uF  [CAP0201_0-5]  69.6 17.79 180 bottom
C469  0.1uF  [CAP0201_0-5]  41.72 17.55 90 bottom
C470  0.1uF  [CAP0201_0-5]  34.86 17.55 90 bottom
C471  0.1uF  [CAP0402_0-75]  18.76 17.46 270 bottom
C472  0.1uF  [CAP0201_0-5]  32.73 17.33 0 bottom
C473  0.01uF  [CAP0201_0-5]  38.01 15.97 0 bottom
C474  0.1uF  [CAP0201_0-5]  72.48 15.89 180 bottom
C475  0.1uF  [CAP0201_0-5]  23.53 15.73 270 bottom
C476  0.1uF  [CAP0402_0-75]  11.31 15.27 90 bottom
C477  0.1uF  [CAP0201_0-5]  72.48 15.12 180 bottom
C478  0.1uF  [CAP0201_0-5]  23.53 14.21 90 bottom
C479  0.1uF  [CAP0402_0-75]  14.94 13.72 90 bottom
C480  0.1uF  [CAP0402_0-75]  9.44 13.52 180 bottom
C481  0.1uF  [CAP0201_0-5]  18.61 13.42 270 bottom
C482  2.2uF  [CAP0402_0-75]  11.56 12.25 180 bottom
C483  10uF  [CAP0402_0-75]  9.44 12.25 180 bottom
C484  0.1uF  [CAP0201_0-5]  41.44 12.05 0 bottom
C485  0.1uF  [CAP0201_0-5]  18.61 11.9 90 bottom
C486  22uF  [CAP0603_1]  48.91 11.54 270 bottom
C487  0.1uF  [CAP0201_0-5]  41.97 10.84 180 bottom
C488  0.1uF  [CAP0201_0-5]  28.36 10.39 0 bottom
C489  0.1uF  [CAP0201_0-5]  29.88 10.17 180 bottom
C490  0.01uF  [CAP0201_0-5]  13.12 9.87 90 bottom
C491  4.7uF  [CAP0603_1]  47.08 8.49 0 bottom
C492  0.1uF  [CAP0201_0-5]  42.05 7.15 180 bottom
C493  0.1uF  [CAP0201_0-5]  33.15 101.12 225 bottom
C496  0.1uF  [CAP0201_0-5]  52.04 140.43 0 bottom
C497  0.1uF  [CAP0201_0-5]  20.76 141.5 0 top
C498  0.1uF  [CAP0402_0-75]  48.16 133.48 90 top
C499  0.1uF  [CAP0402_0-75]  9.63 61.09 0 top
C500  0.1uF  [CAP0402_0-75]  6.86 70.5 270 bottom
C502  0.1uF  [CAP0402_0-75]  6.27 73.42 90 bottom
C509  0.1uF  [CAP0402_0-75]  62.51 48.81 180 bottom
C510  0.1uF  [CAP0201_0-5]  64.8 37.22 180 top
C511  0.1uF  [CAP0201_0-5]  60.55 37.56 180 bottom
C512  0.1uF  [CAP0201_0-5]  61.75 29.54 270 bottom
C513  0.1uF  [CAP0201_0-5]  69.47 29.82 0 bottom
C514  0.1uF  [CAP0201_0-5]  63.65 34.56 180 top
C515  0.1uF  [CAP0201_0-5]  63.14 28.57 0 bottom
C516  0.1uF  [CAP0201_0-5]  60.2 28.83 90 bottom
D1  BZX84C6V8LT1G  [SOT23-123_1-2]  51.3 59.02 180 top
D2  TPD1E01B04DPLT  [DIO_DFN0201_0-4]  9.39 46.3 90 top
D4  TPD1E01B04DPLT  [DIO_DFN0201_0-4]  9.77 31.48 0 top
D5  ESD122DMXR  [X2SON3_ESD122DMX_30X40_0-4]  10.04 29.95 180 top
D7  TPD1E10B06DPYR  [DIO_DFN0402_0-5]  7.97 19.39 270 top
D8  TPD1E10B06DPYR  [DIO_DFN0402_0-5]  77.05 14.08 90 top
D9  TPD1E01B04DPLT  [DIO_DFN0201_0-4]  4.79 44.8 90 bottom
D10  TPD1E01B04DPLT  [DIO_DFN0201_0-4]  5.27 27.68 270 bottom
D12  TPD1E10B06DPYR  [DIO_DFN0402_0-5]  43.93 17.49 90 bottom
D13  TPD1E10B06DPYR  [DIO_DFN0402_0-5]  37.07 17.49 90 bottom
D14  BZX84C6V8LT1G  [SOT23-123_1-2]  68.59 81.05 180 bottom
FB1  300E  [IND0603]  11.47 121.88 90 bottom
FB2  300E  [IND0603]  14.99 123.99 90 bottom
FB3  300E  [IND0603]  18.09 113.59 180 bottom
FL1  120E  [EMIFIL_BLM15A_0402_0-6]  54.75 141.79 270 top
FL2  120E  [EMIFIL_BLM15A_0402_0-6]  56.6 136.1 90 top
FL3  120E  [EMIFIL_BLM15A_0402_0-6]  51.45 108.76 90 top
FL4  26E  [EMIFIL_BLM18K_0603_0-7]  51.87 105.19 180 top
FL5  120E  [EMIFIL_BLM15A_0402_0-6]  49.91 103.06 180 top
FL6  120E  [EMIFIL_BLM15A_0402_0-6]  50.56 101.51 180 top
FL7  26E  [EMIFIL_BLM18K_0603_0-7]  52.55 101.07 90 top
FL8  120E  [EMIFIL_BLM15A_0402_0-6]  4.75 99.04 270 top
FL9  120E  [EMIFIL_BLM15A_0402_0-6]  25.38 89.34 0 top
FL10  120E  [EMIFIL_BLM15A_0402_0-6]  62.94 78.85 180 top
FL12  120E  [EMIFIL_BLM15A_0402_0-6]  71.69 48.07 180 top
FL13  120E  [EMIFIL_BLM15A_0402_0-6]  25.58 116.17 0 bottom
FL14  120E  [EMIFIL_BLM15A_0402_0-6]  22.37 112.63 90 bottom
FL15  120E  [EMIFIL_BLM15P_0402]  71.93 110.9 90 bottom
FL16  120E  [EMIFIL_BLM15A_0402_0-6]  51.97 110.4 180 bottom
FL17  120E  [EMIFIL_BLM15A_0402_0-6]  5.22 107.23 90 bottom
FL18  26E  [EMIFIL_BLM18K_0603_0-7]  18.06 102.97 270 bottom
FL19  120E  [EMIFIL_BLM15A_0402_0-6]  20.21 98.77 0 bottom
FL20  120E  [EMIFIL_BLM15P_0402]  71.96 88.45 90 bottom
FL21  120E  [EMIFIL_BLM15A_0402_0-6]  64.58 81.21 90 bottom
FL22  120E  [EMIFIL_BLM15A_0402_0-6]  54.36 76.62 0 bottom
FL23  120E  [EMIFIL_BLM15A_0402_0-6]  46.88 72.78 180 bottom
FL25  120E  [EMIFIL_BLM15A_0402_0-6]  20.03 17.43 90 bottom
FL26  120E  [EMIFIL_BLM15A_0402_0-6]  13.54 13.72 270 bottom
J1  CON_JACK3_U.FL-R-SMT-1  [CON_JACK3_U-FL-R-SMT_P_S_S_1-3]  59.13 153.95 270 top
J2  CON_JACK3_U.FL-R-SMT-1  [CON_JACK3_U-FL-R-SMT_P_S_S_1-3]  70.73 153.95 270 top
J3  HDR_2X20  [HDR_2X20_PEC20DAAN_S_T_8-6]  9.23 128.2 0 top
J4  CON_RJ45-14_LPJG16314A4NL  [CON_RJ45-14_LPJG16314A4NL_S_R_T_13-6]  69.42 112.04 90 top
J5  CON_HDMI_1X19_F  [CON_19X1_10029449-001RLF_S_R_S_6-3]  3.57 115.99 270 top
J6  CON_RJ45-14_LPJG16314A4NL  [CON_RJ45-14_LPJG16314A4NL_S_R_T_13-6]  69.42 90.19 90 top
J7  CON_USB-A_4_F  [CON_USBA4_629104151_S_R_S_7-4]  78 75.26 90 top
J8  HDR_1X2  [HDR_1X2_90120-0122_S_T_5-6]  2.36 75.34 90 top
J9  HDR_2X14  [HDR_14X2_100_S_T]  14.31 62.22 180 top
J10  HDR_2X10  [HDR_2X10_PREC010DAAN_S_T_8-4]  14.31 54.6 0 top
J11  CON_USB-C_24_F  [CON_USBC24_2012670_S_R_S_3-9]  3.88 44.95 270 top
J12  CON_AUDIOJACK4_SJ-43514-SMT  [CON_AV4_SJ-43514-SMT_S_R_S_5-1]  76.49 34.78 90 top
J13  CON_USB-C_24_F  [CON_USBC24_2012670_S_R_S_3-9]  3.88 29.95 270 top
J14  HDR_1X2  [HDR_1X2_90120-0122_S_T_5-6]  82.49 27.55 90 top
J15  CON_MUSB-B_5_F  [CON_MUSBB5_629105150521_S_R_S_2-7]  2.7 16.75 270 top
J16  CON_MUSB-B_5_F  [CON_MUSBB5_629105150521_S_R_S_2-7]  82.3 16.75 90 top
J17  HDR_2X10  [HDR_2X10_FTR-110-51-D-06_S_S_8-7]  37.99 10.86 180 top
J18  CON_BOX_2X7_M  [CON_BOX2X7_3020-14-0300-00_P_S_S_10-4]  29.83 140.45 0 bottom
J19  CON_FLEX_1X15_1-1734248-5  [CON_FLEX1X15_1-1734248-5_S_S_S_7-7]  60.39 107.02 180 bottom
J20  CON_SDCARD9_MEM2051-00-195-00-A  [CON_SD9_MEM2051-00-195-00_S_R_S_2-1]  8.41 98.82 90 bottom
J21  CON_FLEX_1X40_FFC2A32  [CON_FLEX1X40_FFC2A32-40-T_S_S_S_4-3]  61.32 69.1 270 bottom
J22  HDR_2X5  [HDR_2X5_PEC05DAAN_S_T_8-6]  5.17 65.67 270 bottom
J23  CON_FLEX_40X1_FH12A-40S-0.5SH  [CON_FLEX40X1_FH12A_S_R_S]  64 9.78 180 bottom
J24  HDR_1X2  [HDR_1X2_90120-0122_S_T_5-6]  56.28 53.56 180 top
L1  2.2nH  [IND0402_0-6]  78.76 153.05 90 top
L2  1.8nH  [IND0402_0-6]  81.42 153.05 90 top
L3  1.3nH  [IND0402_0-6]  27.66 151.99 270 top
L4  2.2nH  [IND0402_0-6]  30.39 151.99 270 top
L5  0.47uH  [IND0806_1-2]  8.31 105.19 0 top
L7  0.47uH  [IND0806_1-2]  22.26 76.05 270 top
L8  0.47uH  [IND_IHLP1212AE-11_130X130_SMD_1-5]  25.9 69.6 270 top
L9  90E  [IND4_DLW21H_90X60_SMD_1-4]  66.29 78.49 270 top
L10  90E  [IND4_DLW21H_90X60_SMD_1-4]  13.54 29.95 180 top
L11  0.47uH  [IND0806_1-2]  54.31 74.79 180 bottom
L12  4.7uH  [IND_XAL6060_260X270_SMD_6-1]  40.6 45.22 0 bottom
L13  1.5uH  [IND_XFL4020_170X170_SMD_2-1]  23.83 34.47 270 bottom
L14  10uH  [IND_1277AS-H_130X110_SMD_1-2]  47.71 14.79 0 bottom
L15  0.47uH  [IND_IHLP1212AE-11_130X130_SMD_1-5]  9.75 76.32 0 top
LD1  150080VS75000  [LED_150080VS75000_80X50_SMD_0-8]  2.68 93.95 270 top
LD2  150040VS73220  [LED_150040GS73220_40X20_SMD_0-4]  79.87 64.35 0 top
LD3  150040RS73220  [LED_150040GS73220_40X20_SMD_0-4]  79.87 62.8 0 top
LD4  150040VS73220  [LED_150040GS73220_40X20_SMD_0-4]  79.87 61.22 0 top
LD5  150040AS73220  [LED_150040GS73220_40X20_SMD_0-4]  79.87 59.65 0 top
LD6  150040AS73220  [LED_150040GS73220_40X20_SMD_0-4]  79.87 58.07 0 top
LD7  150040VS73220  [LED_150040GS73220_40X20_SMD_0-4]  79.87 56.5 0 top
LD8  150040RS73220  [LED_150040GS73220_40X20_SMD_0-4]  79.87 54.92 0 top
LD9  150040VS73220  [LED_150040GS73220_40X20_SMD_0-4]  79.87 53.38 0 top
LD10  150080VS75000  [LED_150080VS75000_80X50_SMD_0-8]  12.5 50.89 0 top
LD11  150080VS75000  [LED_150080VS75000_80X50_SMD_0-8]  54.35 49.84 270 top
LD12  150080VS75000  [LED_150080VS75000_80X50_SMD_0-8]  13.57 27.73 0 top
LD13  150080VS75000  [LED_150080VS75000_80X50_SMD_0-8]  17.71 22.98 180 top
LD14  150080VS75000  [LED_150080VS75000_80X50_SMD_0-8]  49.27 9.08 0 top
LD15  150040RS73220  [LED_150040GS73220_40X20_SMD_0-4]  53.97 6.33 0 top
LD16  150080VS75000  [LED_150080VS75000_80X50_SMD_0-8]  42.58 43.75 0 top
LD17  150080VS75000  [LED_150080VS75000_80X50_SMD_0-8]  5.2 72.84 270 top
MOD1  WL1837MODGIMOCT  [MOD100_WL1831M_530X530]  64.85 141.54 180 top
NOREF  -  []  0 160.26 0 top
NOREF#2  -  []  283.79 3.07 0 top
NOREF#3  -  [unnamed#2]  3.81 8.89 270 top
NOREF#4  -  []  -324.66 219.96 0 top
NOREF#5  -  [unnamed#2]  5.08 157.72 0 top
NOREF#6  -  []  -2.22 -82.71 0 top
NOREF#7  -  [unnamed#2]  62.36 129.47 270 top
NOREF#8  -  []  -361.93 25.83 0 top
NOREF#9  -  [unnamed#2]  4.36 129.47 270 top
NOREF#10  -  []  -290.23 -122.94 0 top
NOREF#11  -  [unnamed#2]  79.92 157.72 0 top
NOREF#12  -  [unnamed#2]  79.92 2.54 0 top
NOREF#13  -  [unnamed#2]  73.9 2.47 0 top
NOREF#14  -  [unnamed#2]  81.19 8.89 270 top
NOREF#15  -  [unnamed#2]  5.08 2.54 0 top
NOREF#16  -  [unnamed#2]  81.19 129.47 270 top
NOREF#17  -  []  2.96 34.71 0 top
NOREF#18  -  [unnamed#2]  9.43 157.72 0 top
NOREF#19  -  [unnamed#2]  9.43 2.47 0 top
NOREF#20  -  [unnamed#2]  4.36 80.47 270 top
NOREF#21  -  []  85 0 90 top
NOREF#22  -  []  85 5.84 90 top
NOREF#23  -  [unnamed#2]  9.43 2.47 180 bottom
NOREF#24  -  [unnamed#2]  9.43 157.72 180 bottom
NOREF#25  -  [unnamed#2]  73.9 2.47 180 bottom
Q1  CSD16301Q2  [WSON6_CSD13202Q2_80X80_0-8]  5.3 93.39 90 top
Q2  IRLML6401  [TO_SOT23-123]  46.71 42.14 0 top
Q3  CSD16301Q2  [WSON6_CSD13202Q2_80X80_0-8]  57.14 49.92 90 top
Q4  CSD16301Q2  [WSON6_CSD13202Q2_80X80_0-8]  69.2 125.42 0 bottom
Q5  CSD16301Q2  [WSON6_CSD13202Q2_80X80_0-8]  80.2 108.63 90 bottom
Q6  CSD16301Q2  [WSON6_CSD13202Q2_80X80_0-8]  82.23 106.94 270 top
Q7  CSD16301Q2  [WSON6_CSD13202Q2_80X80_0-8]  82.89 105.05 270 bottom
Q8  CSD16301Q2  [WSON6_CSD13202Q2_80X80_0-8]  78.43 84.72 90 bottom
Q9  CSD16301Q2  [WSON6_CSD13202Q2_80X80_0-8]  81.48 84.72 90 bottom
Q13  CSD16301Q2  [WSON6_CSD13202Q2_80X80_0-8]  14.4 37.07 270 bottom
Q14  CSD25310Q2  [SON6_CSD17313Q2_80X80]  17.12 33.6 90 bottom
Q16  CSD25310Q2  [SON6_CSD17313Q2_80X80]  17.12 30.91 270 bottom
Q17  IRLML6401  [TO_SOT23-123]  42.52 20.84 180 bottom
Q18  IRLML6401  [TO_SOT23-123]  35.81 20.84 180 bottom
Q20  CSD16301Q2  [WSON6_CSD13202Q2_80X80_0-8]  5.98 76.21 180 top
R1  0E  [RES0402_0-5#2]  59.13 149.57 90 top
R2  0E  [RES0402_0-5#2]  70.73 149.57 90 top
R3  0E  [RES0402_0-5#2]  58.71 149.15 0 top
R4  0E  [RES0402_0-5#2]  71.15 149.15 0 top
R5  22E_1%  [RES0201_0-5]  56.3 145.88 0 top
R6  10K_1%  [RES0201_0-5]  72.68 145.04 0 top
R7  0E  [RES0201_0-5]  56.3 144.94 0 top
R8  0E  [RES0402_0-5]  32.86 138.58 180 top
R9  0E  [RES0402_0-5]  32.37 139.07 90 top
R10  10K_1%  [RES0201_0-5]  32.86 136.3 0 top
R11  10K  [RES0201_0-5]  12.8 138.38 180 top
R12  49.9K_1%  [RES0402_0-5]  32.86 137.31 0 top
R13  4.7K  [RES0201_0-5]  4.52 137.51 90 top
R14  100K_1%  [RES0201_0-5]  3.75 137.51 270 top
R15  0E  [RES0201_0-5]  2.39 136.42 0 top
R16  10K  [RES0201_0-5]  15.33 136.32 0 top
R17  10K  [RES0201_0-5]  16.93 135.72 270 top
R18  10K_1%  [RES0201_0-5]  23.19 135.53 90 top
R19  10K_1%  [RES0201_0-5]  25.73 135.53 90 top
R20  10K_1%  [RES0201_0-5]  28.27 135.53 90 top
R21  10K_1%  [RES0201_0-5]  35.89 135.53 90 top
R22  10K_1%  [RES0201_0-5]  38.43 135.53 90 top
R23  0E  [RES0402_0-5]  73.37 134.68 180 top
R24  33E  [RES0201_0-5]  61.35 133.53 270 top
R25  10K  [RES0201_0-5]  37.17 133.32 270 top
R26  10K  [RES0201_0-5]  39.71 133.32 270 top
R27  10K  [RES0201_0-5]  22.37 133.11 180 top
R28  10K  [RES0201_0-5]  20.86 133.1 180 top
R29  0E  [RES0603_0-75]  71.89 128.43 180 top
R30  4.7K  [RES0201_0-5]  48.28 134.01 180 bottom
R31  4.7K  [RES0201_0-5]  48.28 133.25 180 bottom
R32  0E  [RES0201_0-5]  26.37 116.36 0 top
R33  10E_1%  [RES0402_0-5]  42.5 120.25 270 bottom
R34  0E  [RES0201_0-5]  13.9 124.36 270 top
R35  10K  [RES0201_0-5]  59.61 123.81 90 top
R36  0E  [RES0201_0-5]  44.45 123.52 180 top
R37  10E_1%  [RES0402_0-5]  43.77 120.25 270 bottom
R38  2.49K_1%  [RES0402_0-5]  61.67 122.08 0 top
R39  0E  [RES0201_0-5]  32.63 110.96 270 bottom
R41  10K_1%  [RES0201_0-5]  10.99 120.86 90 top
R47  2.49K_1%  [RES0402_0-5]  61.49 120.11 0 top
R48  0.01E_1%  [RES_KRL3216T4_1206-4_0-7]  43.19 120.03 180 top
R49  2.49K_1%  [RES0402_0-5]  56.18 119.69 180 top
R52  0E  [RES0201_0-5]  33.04 118.54 270 top
R53  0E  [RES0201_0-5]  52.03 121.42 0 bottom
R54  2.49K_1%  [RES0402_0-5]  56.18 118.35 180 top
R55  0E  [RES0201_0-5]  34.43 116.29 270 bottom
R56  0E  [RES0201_0-5]  36.98 117.74 270 top
R57  0E  [RES0201_0-5]  29.9 117.81 90 top
R58  10K  [RES0201_0-5]  49.37 116.85 180 top
R60  0E  [RES0201_0-5]  43.44 115.1 90 top
R61  4.7K  [RES0201_0-5]  24.88 114.23 180 top
R62  0E  [RES0201_0-5]  23.02 113.83 0 top
R63  10K  [RES0201_0-5]  50.32 111.49 180 top
R64  0E  [RES0402_0-5]  60.74 108.65 0 top
R65  0E  [RES0402_0-5]  47 110.8 0 top
R66  0E  [RES0201_0-5]  21.53 110.54 0 top
R67  499E_0.1%  [RES0402_0-5]  55.84 106.75 0 top
R68  499E_0.1%  [RES0402_0-5]  55.26 104.89 90 top
R69  499E_0.1%  [RES0402_0-5]  48.17 106.44 270 bottom
R70  0.01E_1%  [RES_KRL3216T4_1206-4_0-7]  14.03 103.29 0 top
R71  4.7K  [RES0201_0-5]  20.38 102.52 0 top
R72  0E  [RES0402_0-5]  61.4 102.25 180 top
R73  4.7K  [RES0201_0-5]  19.82 101.35 0 top
R74  33E  [RES0201_0-5]  21.17 101.35 180 top
R75  0E  [RES0201_0-5]  5.78 100.71 270 top
R76  2.49K_1%  [RES0402_0-5]  61.67 100.24 0 top
R77  10K  [RES0201_0-5]  17.23 99.32 90 top
R78  10E_1%  [RES0402_0-5]  11.68 98.68 90 top
R79  10E_1%  [RES0402_0-5]  12.95 98.68 90 top
R80  10K  [RES0201_0-5]  7.78 98.66 90 top
R81  10K  [RES0201_0-5]  8.7 98.66 90 top
R82  10K  [RES0201_0-5]  9.61 98.66 90 top
R83  0E  [RES0201_0-5]  25.56 98.64 90 top
R84  2.49K_1%  [RES0402_0-5]  61.49 98.26 0 top
R85  2.49K_1%  [RES0402_0-5]  56.18 97.81 180 top
R86  2.49K_1%  [RES0402_0-5]  56.18 96.51 180 top
R87  0E  [RES0201_0-5]  25.1 96.42 180 top
R88  220E  [RES0402_0-5]  2.55 91.28 0 top
R89  22E_1%  [RES0201_0-5]  42.1 94.29 90 top
R90  10K  [RES0201_0-5]  7.28 94.27 270 top
R91  10K  [RES0201_0-5]  8.2 94.27 270 top
R92  10K  [RES0201_0-5]  9.11 94.27 270 top
R93  0E  [RES0402_0-5]  10.65 93.22 270 top
R94  10K  [RES0201_0-5]  9.36 92.45 270 top
R95  0E  [RES0402_0-5]  7.91 92.42 180 top
R96  10K  [RES0201_0-5]  15.1 92.41 270 top
R97  10K  [RES0201_0-5]  3.98 91.25 270 top
R98  240E_1%  [RES0402_0-5]  27.39 91.02 180 top
R99  1K_1%  [RES0402_0-5]  8.14 90.61 90 top
R100  0E  [RES0402_0-5]  6.41 90.21 0 top
R101  0E  [RES0805_0-75]  10.63 89.69 0 top
R102  0E  [RES0402_0-5]  62.68 107.38 180 top
R103  0E  [RES0402_0-5]  6.41 88.94 0 top
R104  10K  [RES0201_0-5]  10.41 88.04 180 top
R105  0E  [RES0201_0-5]  11.88 88.04 0 top
R106  0.01E_1%  [RES_KRL3216T4_1206-4_0-7]  17.43 88 90 top
R107  10K  [RES0201_0-5]  21.93 87.77 0 top
R108  11K_1%  [RES0402_0-5]  25.98 87.37 270 top
R109  10E_1%  [RES0402_0-5]  12.56 86.7 0 top
R110  0E  [RES0402_0-5]  6.78 86.39 270 top
R111  10K  [RES0201_0-5]  23.68 86.07 90 top
R112  10K  [RES0201_0-5]  24.57 86.07 90 top
R113  0E  [RES0402_0-5]  21.43 85.86 180 top
R114  10K  [RES0201_0-5]  25.81 85.58 180 top
R115  10E_1%  [RES0402_0-5]  12.56 85.43 0 top
R116  0E  [RES0201_0-5]  61.48 84.58 90 top
R117  10K  [RES0201_0-5]  4.31 84.41 0 top
R118  10K  [RES0201_0-5]  34.36 84.07 90 top
R119  2.2K  [RES0201_0-5]  45.33 83.75 90 top
R120  2.2K  [RES0402_0-5]  46.35 83.75 270 top
R121  1K_1%  [RES0402_0-5]  32.93 82.07 270 top
R122  1K_1%  [RES0402_0-5]  34.2 82.07 90 top
R123  0.01E_1%  [RES_KRL3216T4_1206-4_0-7]  10.87 81.26 90 top
R124  10E_1%  [RES0402_0-5]  20.96 80 270 top
R125  10E_1%  [RES0402_0-5]  22.23 80 270 top
R126  0E  [RES0201_0-5]  15.3 79.9 0 top
R127  100K_1%  [RES0402_0-5]  17.11 79.46 0 top
R129  41.2K_1%  [RES0402_0-5]  9.64 68.91 180 top
R130  0E  [RES0201_0-5]  15.81 78.06 0 top
R132  100K_1%  [RES0402_0-5]  15.56 76.9 180 top
R133  100K_1%  [RES0402_0-5]  9.64 67.64 0 top
R134  0.01E_1%  [RES_KRL3216T4_1206-4_0-7]  25.13 76.41 0 top
R135  240E_1%  [RES0402_0-5]  34.23 75.79 270 top
R136  100K_1%  [RES0402_0-5]  16.11 74.51 90 top
R137  100K_1%  [RES0402_0-5]  17.38 74.51 270 top
R140  10K  [RES0201_0-5]  31.47 75.63 180 top
R141  0E  [RES0201_0-5]  6.94 69.01 90 top
R142  100K_1%  [RES0402_0-5]  7.96 68.88 270 top
R143  0E  [RES0201_0-5]  18.63 72.12 0 top
R144  100K_1%  [RES0402_0-5]  18.38 70.95 180 top
R145  10E_1%  [RES0402_0-5]  13.82 67.95 270 top
R146  0E  [RES0402_0-5]  16.13 72.13 270 top
R147  10E_1%  [RES0402_0-5]  15.09 67.95 270 top
R148  0.01E_1%  [RES_KRL3216T4_1206-4_0-7]  30.93 69.04 0 top
R149  10E_1%  [RES0402_0-5]  36.47 69.03 180 top
R150  41.2K_1%  [RES0402_0-5]  18.67 68.77 90 top
R151  100K_1%  [RES0402_0-5]  19.94 68.77 270 top
R152  3.4K_1%  [RES0201_0-5]  48.76 58.74 270 top
R153  16.5K_1%  [RES0402_0-5]  50.15 61.84 270 top
R154  0E  [RES0402_0-5]  42.38 67.65 0 top
R155  10E_1%  [RES0402_0-5]  36.47 67.76 180 top
R156  10K_1%  [RES0201_0-5]  51.16 61.84 270 top
R157  0E  [RES0201_0-5]  6.95 65.39 90 top
R158  0E  [RES0201_0-5]  7.71 65.39 90 top
R159  220E  [RES0402_0-5]  82.06 64.35 180 top
R160  10K  [RES0201_0-5]  77.22 63.64 0 top
R161  220E  [RES0402_0-5]  82.06 62.8 180 top
R162  10K  [RES0201_0-5]  77.22 62.75 0 top
R163  0E  [RES0201_0-5]  6.95 62.65 90 top
R164  0E  [RES0201_0-5]  7.71 62.65 90 top
R165  4.7K  [RES0201_0-5]  59.31 41.61 270 top
R166  220E  [RES0402_0-5]  82.06 61.22 180 top
R167  220E  [RES0402_0-5]  82.06 59.65 180 top
R168  220E  [RES0402_0-5]  82.06 58.07 180 top
R169  10K  [RES0201_0-5]  74.4 57.48 0 top
R170  220E  [RES0402_0-5]  82.06 56.5 180 top
R171  220E  [RES0402_0-5]  82.06 54.92 180 top
R172  10K  [RES0201_0-5]  76.19 53.86 90 top
R173  10K  [RES0201_0-5]  77.1 53.86 90 top
R175  220E  [RES0402_0-5]  82.06 53.38 180 top
R176  10K  [RES0201_0-5]  13.16 137.44 0 top
R177  10K  [RES0201_0-5]  25.75 51.75 0 top
R178  0E  [RES0603_0-75]  5.14 52.49 90 top
R179  10K  [RES0201_0-5]  25.75 50.48 0 top
R180  10K  [RES0201_0-5]  34.98 50.48 180 top
R181  10K  [RES0201_0-5]  19.26 50.4 0 top
R182  1K_1%  [RES0402_0-5]  15.55 50.38 180 top
R184  10K  [RES0201_0-5]  19.26 49.49 0 top
R185  10K  [RES0201_0-5]  25.75 49.08 0 top
R187  10K  [RES0201_0-5]  51.59 46.05 0 top
R188  220E  [RES0402_0-5]  52.45 47.76 270 top
R189  0E  [RES0402_0-5]  65.17 44.78 180 top
R190  10K  [RES0201_0-5]  61.62 43.72 90 top
R191  10K  [RES0201_0-5]  62.38 43.72 90 top
R192  10K  [RES0201_0-5]  65.22 43.64 0 top
R193  10K  [RES0201_0-5]  51.95 41.83 270 top
R194  0E  [RES0402_0-5]  65.5 41.3 180 top
R195  10K  [RES0201_0-5]  61.95 40.24 90 top
R196  10K  [RES0201_0-5]  62.71 40.24 90 top
R197  10K  [RES0201_0-5]  65.55 40.16 0 top
R198  0E  [RES0402_0-5]  59.54 48.94 180 top
R199  10K  [RES0201_0-5]  57.2 39.92 0 top
R200  10K  [RES0201_0-5]  47.56 39.4 180 top
R201  4.7K  [RES0201_0-5]  57.29 38.02 0 top
R202  100K_1%  [RES0201_0-5]  41.01 37.12 90 top
R203  100K_1%  [RES0201_0-5]  39.74 37.12 90 top
R204  100K_1%  [RES0201_0-5]  38.47 37.12 90 top
R205  100K_1%  [RES0201_0-5]  37.2 37.12 90 top
R206  100K_1%  [RES0201_0-5]  35.93 37.12 90 top
R207  100K_1%  [RES0201_0-5]  34.66 37.12 90 top
R208  100K_1%  [RES0201_0-5]  33.39 37.12 90 top
R209  100K_1%  [RES0201_0-5]  32.12 37.12 90 top
R210  100K_1%  [RES0201_0-5]  54.47 37.12 90 top
R211  100K_1%  [RES0201_0-5]  53.2 37.12 90 top
R212  100K_1%  [RES0201_0-5]  51.93 37.12 90 top
R213  100K_1%  [RES0201_0-5]  50.66 37.12 90 top
R214  100K_1%  [RES0201_0-5]  49.39 37.12 90 top
R215  100K_1%  [RES0201_0-5]  48.12 37.12 90 top
R216  100K_1%  [RES0201_0-5]  46.85 37.12 90 top
R217  100K_1%  [RES0201_0-5]  45.58 37.12 90 top
R218  10K  [RES0201_0-5]  44.9 48.73 270 top
R219  0E  [RES0603_0-75]  8.09 23.02 270 top
R220  10K  [RES0201_0-5]  57.29 36.9 180 top
R221  0E  [RES0201_0-5]  57.64 34.53 90 top
R222  0E  [RES0402_0-5]  58.73 35.14 90 top
R223  10K_1%  [RES0201_0-5]  16.33 34.3 180 top
R224  0E  [RES0201_0-5]  66.06 33.62 270 bottom
R225  0E  [RES0201_0-5]  64.49 27.8 270 bottom
R226  0E  [RES0201_0-5]  65.4 27.8 270 bottom
R227  1K_1%  [RES0402_0-5]  16.21 28.22 270 top
R228  49.9E_1%  [RES0402_0-5]  68.2 27.08 90 top
R229  0E  [RES0201_0-5]  64.11 35.55 180 top
R230  0E  [RES0201_0-5]  65.91 34.98 90 top
R231  0E  [RES0201_0-5]  58.93 28.06 90 bottom
R232  0E  [RES0201_0-5]  66.8 28.04 0 bottom
R235  0E  [RES0402_0-5]  56.68 25.99 90 top
R236  1.1K_1%  [RES0201_0-5]  41.01 25.89 270 top
R237  1.1K_1%  [RES0201_0-5]  39.74 25.89 270 top
R238  1.1K_1%  [RES0201_0-5]  38.47 25.89 270 top
R239  1.1K_1%  [RES0201_0-5]  37.2 25.89 270 top
R240  1.1K_1%  [RES0201_0-5]  35.93 25.89 270 top
R241  1.1K_1%  [RES0201_0-5]  34.66 25.89 270 top
R242  1.1K_1%  [RES0201_0-5]  33.39 25.89 270 top
R243  1.1K_1%  [RES0201_0-5]  32.12 25.89 270 top
R244  1.1K_1%  [RES0201_0-5]  54.47 25.89 270 top
R245  1.1K_1%  [RES0201_0-5]  53.2 25.89 270 top
R246  1.1K_1%  [RES0201_0-5]  51.93 25.89 270 top
R247  1.1K_1%  [RES0201_0-5]  50.66 25.89 270 top
R248  1.1K_1%  [RES0201_0-5]  49.39 25.89 270 top
R249  1.1K_1%  [RES0201_0-5]  48.12 25.89 270 top
R250  1.1K_1%  [RES0201_0-5]  46.85 25.89 270 top
R251  1.1K_1%  [RES0201_0-5]  45.58 25.89 270 top
R252  10K  [RES0201_0-5]  71.27 24.73 90 top
R253  10K  [RES0201_0-5]  48.42 23.59 270 top
R254  10K  [RES0201_0-5]  49.34 23.59 270 top
R255  1K_1%  [RES0402_0-5]  72.73 23.44 180 top
R256  0E  [RES0603_0-75]  79.13 23.56 270 top
R257  220E  [RES0402_0-5]  20.82 22.49 90 top
R258  1K_1%  [RES0402_0-5]  72.73 22.17 180 top
R259  1K_1%  [RES0402_0-5]  72.73 20.9 180 top
R260  1K_1%  [RES0402_0-5]  72.73 19.63 180 top
R261  4.87K_1%  [RES0402]  74.82 19.58 0 top
R262  4.7K  [RES0201_0-5]  51.47 19.11 0 top
R264  4.7K  [RES0201_0-5]  71.84 13.83 180 top
R265  4.7K  [RES0201_0-5]  71.84 13.07 180 top
R266  10K_1%  [RES0201_0-5]  14.06 10.55 270 top
R267  220E  [RES0402_0-5]  52.31 8.93 180 top
R268  30K  [RES0402_0-5]  50.2 7.26 0 top
R269  20K_1%  [RES0402_0-5]  51.98 7.15 270 top
R270  4.7K  [RES0201_0-5]  70.3 6.88 0 top
R271  220E  [RES0402_0-5]  56.08 6.33 180 top
R272  10K_1%  [RES0201_0-5]  58.71 142.15 0 bottom
R273  10K_1%  [RES0201_0-5]  58.71 141.23 180 bottom
R274  100K_1%  [RES0201_0-5]  13.61 134.65 90 bottom
R275  0E  [RES0402_0-5]  37.94 133.99 0 bottom
R276  0E  [RES0402_0-5]  35.4 133.99 0 bottom
R277  0E  [RES0402_0-5]  27.78 133.99 0 bottom
R278  0E  [RES0402_0-5]  25.24 133.99 0 bottom
R279  0E  [RES0402_0-5]  22.7 133.99 0 bottom
R280  0E  [RES0402_0-5]  38.43 133.5 90 bottom
R281  0E  [RES0402_0-5]  35.89 133.5 90 bottom
R282  0E  [RES0402_0-5]  28.27 133.5 90 bottom
R283  0E  [RES0402_0-5]  25.73 133.5 90 bottom
R284  0E  [RES0402_0-5]  23.19 133.5 90 bottom
R285  10K  [RES0201_0-5]  52.41 132.81 270 bottom
R286  220E  [RES0402_0-5]  75.94 128.61 270 bottom
R287  0E  [RES0201_0-5]  13.25 125.97 0 bottom
R288  220E  [RES0402_0-5]  82.39 108.75 270 bottom
R289  0E  [RES0402_0-5]  65.95 126.07 0 bottom
R290  0E  [RES0402_0-5]  28.89 124.6 180 bottom
R291  2.49K_1%  [RES0402_0-5]  59.53 124.15 90 bottom
R292  2.49K_1%  [RES0402_0-5]  58.26 124.15 270 bottom
R293  2.49K_1%  [RES0402_0-5]  56.99 124.15 270 bottom
R294  2.49K_1%  [RES0402_0-5]  55.72 124.15 90 bottom
R295  2.49K_1%  [RES0402_0-5]  60.93 124.08 270 bottom
R296  10K  [RES0201_0-5]  37.43 126.21 90 bottom
R297  10K  [RES0201_0-5]  49.89 123.1 180 bottom
R298  5.76K_1%  [RES0402_0-5]  56.22 122.1 270 bottom
R299  2.49K_1%  [RES0402_0-5]  54.78 122.1 270 bottom
R300  10K  [RES0201_0-5]  61.68 122.07 90 bottom
R301  22E_1%  [RES0201_0-5]  58.13 122.07 270 bottom
R302  22E_1%  [RES0201_0-5]  57.24 122.07 270 bottom
R303  10K  [RES0201_0-5]  34.75 123.34 270 bottom
R304  10K  [RES0201_0-5]  53.63 122.39 90 top
R305  1K_1%  [RES0402_0-5]  50.17 121.34 270 bottom
R306  10K  [RES0201_0-5]  35.51 123.34 270 bottom
R307  10K  [RES0201_0-5]  37.03 123.34 270 bottom
R308  10K  [RES0201_0-5]  36.27 123.34 270 bottom
R309  10K  [RES0201_0-5]  33.98 123.34 270 bottom
R310  10K  [RES0201_0-5]  32.46 123.34 270 bottom
R311  2.49K_1%  [RES0402_0-5]  54.19 120.18 90 bottom
R312  0E  [RES0402_0-5]  50.68 119.41 0 bottom
R313  10K  [RES0201_0-5]  47.76 119.81 90 bottom
R314  0E  [RES0201_0-5]  3.98 119.75 0 bottom
R315  100K_1%  [RES0201_0-5]  49.15 121.09 90 bottom
R316  2.2K  [RES0402_0-5]  12.12 119.52 0 bottom
R317  10K  [RES0201_0-5]  49.14 118.88 90 bottom
R318  10K  [RES0201_0-5]  33.22 123.34 270 bottom
R319  10K  [RES0201_0-5]  31.7 123.34 270 bottom
R320  22E_1%  [RES0201_0-5]  51.47 121.42 0 bottom
R321  0E  [RES0402_0-5]  47.65 118.6 180 bottom
R322  10K  [RES0201_0-5]  54.04 118.37 180 bottom
R323  2.2K  [RES0402_0-5]  12.12 118.37 0 bottom
R324  0E  [RES0402_0-5]  53.83 117.36 0 bottom
R325  10K  [RES0201_0-5]  12.41 116.52 0 bottom
R326  10K  [RES0402_0-5]  14.54 115.58 0 bottom
R327  4.3K_1%  [RES0402_0-5]  16.67 115.54 0 bottom
R328  10K_1%  [RES0201_0-5]  65.04 113.03 0 bottom
R329  10K  [RES0201_0-5]  61.01 111.4 90 bottom
R330  1.5K  [RES0201_0-5]  60.25 111.4 270 bottom
R331  0E  [RES0201_0-5]  38.13 111.05 270 bottom
R333  49.9K_1%  [RES0402_0-5]  20.19 110.55 180 bottom
R334  220E  [RES0402_0-5]  79.59 106 180 top
R335  0E  [RES0402_0-5]  83.05 107.17 0 bottom
R336  22E_1%  [RES0201_0-5]  22.69 107.6 270 bottom
R337  0E  [RES0201_0-5]  22.69 107.04 90 bottom
R338  0E  [RES0402_0-5]  78.1 108.14 270 bottom
R339  0E  [RES0603_0-75]  73.54 105.41 180 bottom
R340  0E  [RES0402_0-5]  79.59 107.27 0 top
R341  220E  [RES0402_0-5]  79.53 86.93 0 bottom
R342  220E  [RES0402_0-5]  80.36 104.55 0 bottom
R343  22E_1%  [RES0201_0-5]  22.26 102.63 90 bottom
R344  2.49K_1%  [RES0402_0-5]  59.53 102.31 90 bottom
R345  2.49K_1%  [RES0402_0-5]  58.26 102.31 270 bottom
R346  2.49K_1%  [RES0402_0-5]  56.99 102.31 270 bottom
R347  2.49K_1%  [RES0402_0-5]  55.72 102.31 90 bottom
R348  2.49K_1%  [RES0402_0-5]  60.95 102.24 270 bottom
R349  5.76K_1%  [RES0402_0-5]  56.22 100.26 270 bottom
R350  2.49K_1%  [RES0402_0-5]  54.78 100.26 270 bottom
R351  10K  [RES0201_0-5]  61.68 100.23 90 bottom
R352  2.2K_1%  [RES0201_0-5]  60.67 100.23 90 bottom
R353  22E_1%  [RES0201_0-5]  58.13 100.23 270 bottom
R354  22E_1%  [RES0201_0-5]  57.24 100.23 270 bottom
R355  0E  [RES0402_0-5]  24.12 98.35 90 bottom
